# Altium PCB Secondary-PCB-v1.0.PcbDoc
Units mil, origin at the board's own origin, x right, y up, seen from the top; angles counter-clockwise.
Board outline 787.4 x 1661.72 mil, 2 copper layers (Top Layer, Bottom Layer), stack 57 mil thick; 32 components, 29 nets, 98 pads, 0 vias.
Unrouted connection lines stored in the file: 45.
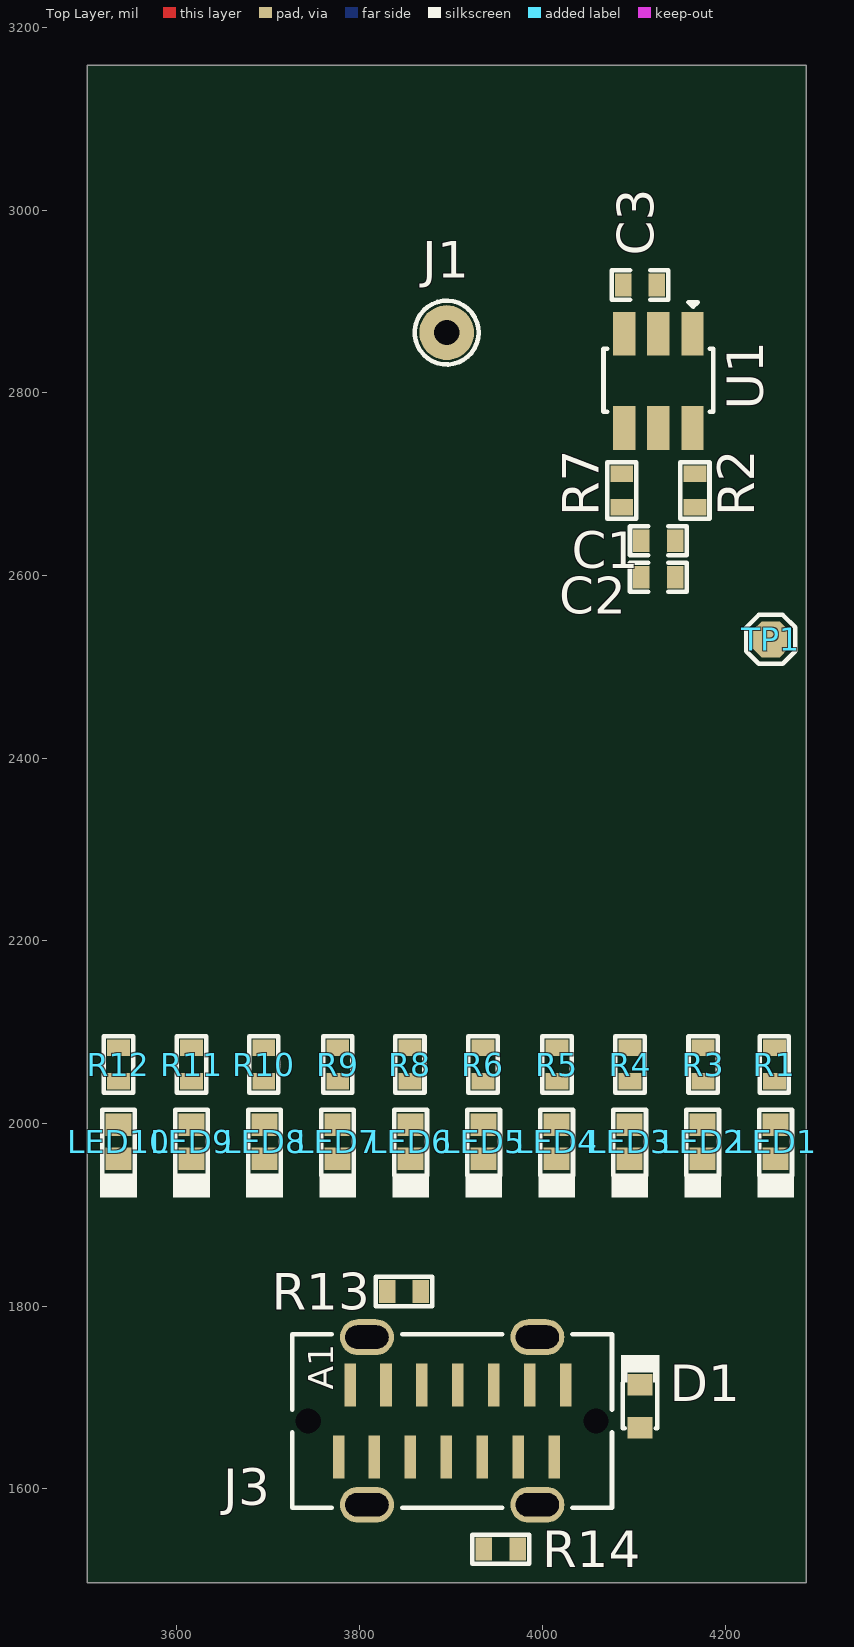
[diagram p0: Top Layer view]
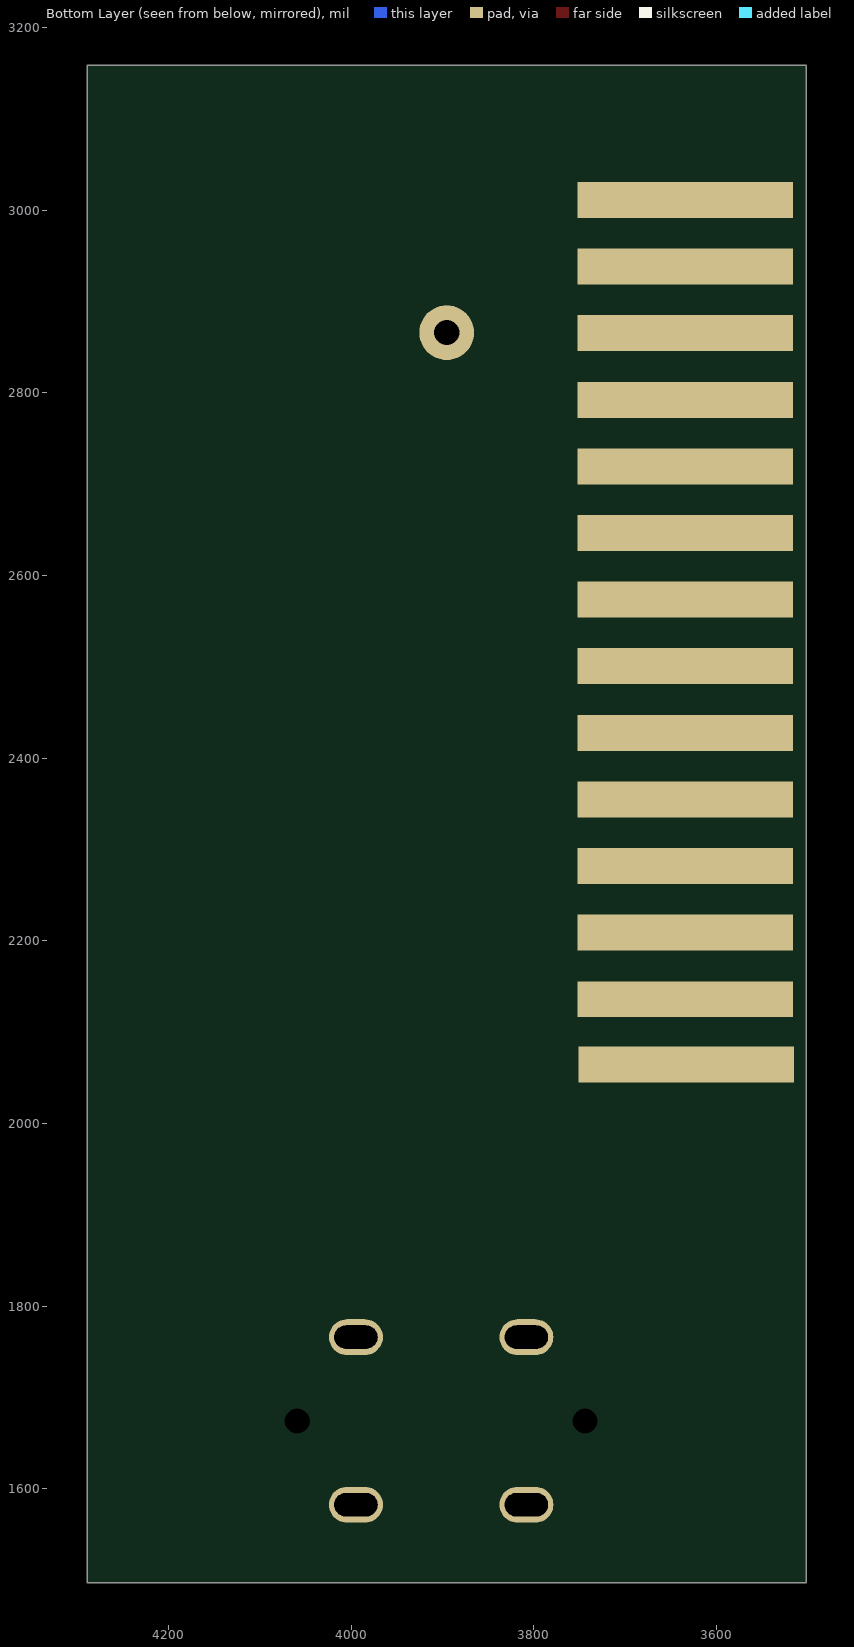
[diagram p1: Bottom Layer view, seen from below]

## Layer stack, top to bottom
Top Solder: solder mask 3, Solder Resist, Dk 3.5
Top Layer: signal copper 10
Dielectric 1: dielectric 37, FR-4, Dk 4.8
Bottom Layer: signal copper 10
Bottom Solder: solder mask 3, Solder Resist, Dk 3.5

## Board outline
3501.57,1497 3501.57,3158.72 4288.98,3158.72 4288.98,1497

## Design rules (kind name [scope] priority, off if disabled: settings)
Clearance [All] p1: gap=10 ignorepadtopadclearanceinfootprint=FALSE except(0: Arc-Hole Track-Hole SMDPad-Hole THPad-Hole Via-Hole Fill-Hole Poly-Hole Region-Hole Text-Hole)
PolygonConnect [All] p1: connectstyle=Relief reliefconductorwidth=10 reliefentries=4 polygonreliefangle="90 Angle" airgapwidth=10
RoutingVias [All] p1: holewidth=28 width=50 viastyle="Through Hole" minholewidth=28 minwidth=50 maxholewidth=28 maxwidth=50
SolderMaskExpansion [All] p1: expansion=4 istentingtop=FALSE
Width [All] p1: maxlimit=10 minlimit=10 preferedwidth=10
30 further rules are at their usual default settings.

## Components (designator, comment, footprint, x,y, rotation, side; value= is the part's Value field where it differs from the comment)
C1 "100nF" Cap-0402 4127,2638 r180 top
C2 "10uF" Cap-0402 4127,2598 r180 top
C3 "22PF" Cap-0402 4107,2918 r180 top value=22pF
D1 "LESD5D5.0CT1G" SOD-523 4107,1690.38 r90 top
J1 "F9-10-5.5Z" F9-10-5.5Z 3895.28,2865.83 r0 top
J3 "TYPE-C-31-D-07" TYPE-C-31-D-07 3901.3,1674.37 r90 top
LED1 "Blue" LED-0402 4255.31,1980 r270 top
LED2 "Blue" LED-0402 4175.39,1980 r270 top
LED3 "Blue" LED-0402 4095.47,1980 r270 top
LED4 "Blue" LED-0402 4015.55,1980 r270 top
LED5 "Blue" LED-0402 3935.63,1980 r270 top
LED6 "Blue" LED-0402 3855.71,1980 r270 top
LED7 "Blue" LED-0402 3775.79,1980 r270 top
LED8 "Blue" LED-0402 3695.87,1980 r270 top
LED9 "Blue" LED-0402 3615.94,1980 r270 top
LED10 "Blue" LED-0402 3536.02,1980 r270 top
R1 "10R" Res-0402 4254,2064.5 r90 top
R2 "0R" Res-0402 4167,2693 r270 top
R3 "10R" Res-0402 4176,2064.5 r90 top
R4 "10R" Res-0402 4096,2064.5 r90 top
R5 "10R" Res-0402 4016,2064.5 r90 top
R6 "10R" Res-0402 3935,2064.5 r90 top
R7 "0R" Res-0402 4087,2693 r270 top
R8 "10R" Res-0402 3855,2064.5 r90 top
R9 "10R" Res-0402 3776,2064.5 r90 top
R10 "10R" Res-0402 3695,2064.5 r90 top
R11 "10R" Res-0402 3616,2064.5 r90 top
R12 "10R" Res-0402 3536,2064.5 r90 top
R13 "5.1K" Res-0402 3848.5,1816 r180 top
R14 "5.1K" Res-0402 3954.5,1534 r0 top
TP1 "TEST POINT 0.5mm Dia" "Test-point - 0.5mm" 4250,2530 r180 top
U1 "TTP233H-BA6" SOT-23-6 4127,2813 r270 top

## Footprints (in the part's own frame and the unit in brackets; to place one, negate y for a bottom-side part, rotate by r counter-clockwise, add the part's x,y. Pads: shape width x height; smd on the part's side, far side on the other; paste and mask are expansions set on the pad)
Cap-0402 [mil]
  rect 18x25 smd mask+2.36: 1(-18.5,0) 2(18.5,0)
  silkscreen extent -31,-16 31,16, body extent -20,-10 20,10, height 19
F9-10-5.5Z [mil]
  round 60 hole 27.56: 1(0,0)
  silkscreen extent -35,-35 35,35
LED-0402 [mm]
  rect 0.62x0.72 smd: 1(-0.475,0) 2(0.475,0)
  silkscreen extent -0.89,-0.51 1.55,0.51, body extent -0.5,-0.25 0.51,0.25, height 0.45
Res-0402 [mil]
  rect 18x25 smd mask+2.17: 1(-18.5,0) 2(18.5,0)
  silkscreen extent -32,-17 32,16, body extent -23,-11 23,11, height 16
SOD-523 [mm] "SOD-523 Schottky Barrier Diodes (SBD) ROHS"
  rect 0.6x0.7 smd: 1(-0.6,0) 2(0.6,0)
  silkscreen extent -0.61,-0.53 1.42,0.53, body extent -0.8,-0.4 0.8,0.4, height 0.7
SOT-23-6 [mm]
  rect 1.22x0.62 smd: 1(-1.31,0.95) 2(-1.31,0) 3(-1.31,-0.95) 4(1.31,-0.95) 5(1.31,0) 6(1.31,0.95)
  silkscreen extent -2.18,-1.52 0.86,1.52, body extent -1.5,-1.5 1.5,1.5, height 1.47
"Test-point - 0.5mm" [mm]
  oct 1x1 smd: 1(0,0)
  silkscreen extent -0.68,-0.68 0.68,0.68
TYPE-C-31-D-07 [mm]
  rect 1.2x0.32 smd paste-100 mask+0.05: A1(1,2.84) A4(1,1.84) A5(1,0.84) A6(1,-0.16) A7(1,-1.16) A9(1,-2.16) A12(1,-3.16) B1(-1,-2.84) B4(-1,-1.84) B5(-1,-0.84) B6(-1,0.16) B7(-1,1.16) B9(-1,2.16) B12(-1,3.16)
  oval 1x1.5 hole 0.65 slot 1.2 at 90 deg paste-2539.97 mask+0.05: S1(2.33,2.37) S2(2.33,-2.37) S3(-2.33,-2.37) S4(-2.33,2.37)
  round 0 hole 0.7 unplated paste-2539.97: ""(0,4) ""(0,-4)
  silkscreen extent -2.41,-4.45 2.41,4.44, body extent -2.48,-4.47 2.48,4.47, height 10

## Part data
C1: library part CC0402KRX5R7BB104, "CAP CER 0.1UF 16V X5R 0402", Case Code (Imperial)=0402, Case Code (Metric)=1005, Dielectric=X5R, LCSC Part Number=C106204, Manufacturer=Yageo, Max Operating Temperature=85°C, Min Operating Temperature=-55°C, Package Quantity=1, Resistor Type=Ceramic, Supplier Part Number 1=603-CC402KRX5R7BB104, Tolerance=10%, Voltage Rating=16V, Capacitance=100nF, Case/Package=0402, Category="Ceramic Capacitors", ComponentLink1Description=https://datasheet.ciiva.com/155/mlccorderingcode-155879.pdf?src-supplier=Digi-Key, ComponentLink1URL=https://datasheet.ciiva.com/155/mlccorderingcode-155879.pdf?src-supplier=Digi-Key, ComponentLink2Description=https://datasheet.ciiva.com/155/mlccorderingcode-155878.pdf?src-supplier=Digi-Key, ComponentLink2URL=https://datasheet.ciiva.com/155/mlccorderingcode-155878.pdf?src-supplier=Digi-Key, ComponentLink3Description=https://datasheet.ciiva.com/155/mlccorderingcode-155880.pdf?src-supplier=Digi-Key, ComponentLink3URL=https://datasheet.ciiva.com/155/mlccorderingcode-155880.pdf?src-supplier=Digi-Key, ComponentLink4Description=https://datasheet.ciiva.com/11464/upy-gphc-x5r-4v-to-50v-12-11464869.pdf?src-supplier=Avnet, ComponentLink4URL=https://datasheet.ciiva.com/11464/upy-gphc-x5r-4v-to-50v-12-11464869.pdf?src-supplier=Avnet, Construction=Flat, Depth=0.5mm, Halogen Free="Halogen Free", Height=0.5mm, Lead Free="Lead Free", Length=1mm, Manufacturer Part Number=CC0402KRX5R7BB104, Mount="Surface Mount", Number of Pins=2, Packaging="Tape and Reel", Pricing 1="1=0.10000, 10=0.02300, 50=0.02300, 100=0.01100, 1000=0.00600, 10000=0.00400 (USD)", Radiation Hardening=No, REACH SVHC=Unknown, RoHS=Yes, RoHS Compliant=Yes, Series=CC, Stock 1=936792, Supplier 1=Mouser, Termination=SMD/SMT, Thickness=0.022inch, Voltage Rating (DC)=16V, Width=0.02inch
C2: library part CC0402MRX5R6BB106, "CAP CER 10UF 10V X5R 0402", Case Code (Imperial)=0402, Case Code (Metric)=1005, LCSC Part Number=C962143, Manufacturer=Yageo, Max Operating Temperature=85°C, Min Operating Temperature=-55°C, Supplier Part Number 1=6097631, Tolerance=20%, Voltage Rating=10V, Capacitance=10uF, Case/Package=0402, Category="Ceramic Capacitors", ComponentLink1Description=http://www.yageo.com/documents/recent/UPY-GPHC_X5R_4V-to-50V_25.pdf?src-supplier=Digi-Key, ComponentLink1URL=http://www.yageo.com/documents/recent/UPY-GPHC_X5R_4V-to-50V_25.pdf?src-supplier=Digi-Key, Item Type=Capacitor, Manufacturer Part Number=CC0402MRX5R6BB106, Mount="Surface Mount", Packaging="Tape and Reel", Pricing 1="10000=0.02650, 20000=0.02590, 30000=0.02550, 40000=0.02530, 50000=0.02450 (USD)", RoHS=Yes, RoHS Compliant=Yes, Stock 1=80000, Supplier 1="Future Electronics"
C3: library part CC0402JRNPO9BN220, "CAP CER 22PF 50V C0G/NPO 0402", Case Code (Imperial)=0402, Case Code (Metric)=1005, Dielectric=C0G, Dielectric Material=Ceramic, Insulation Resistance=100GR, LCSC Part Number=C106203, Manufacturer=Yageo, Max Operating Temperature=125°C, Min Operating Temperature=-55°C, Package Quantity=1, Supplier Part Number 1=9105957, Temperature Coefficient=30ppm/°C, Tolerance=5%, Voltage=50V, Case/Package=0402, Category="Ceramic Capacitors", ComponentLink1Description=https://datasheet.ciiva.com/5789/1443161-5789509.pdf?src-supplier=Farnell, ComponentLink1URL=https://datasheet.ciiva.com/5789/1443161-5789509.pdf?src-supplier=Farnell, ComponentLink2Description=https://datasheet.ciiva.com/8033/1443161-8033606.pdf?src-supplier=Element14, ComponentLink2URL=https://datasheet.ciiva.com/8033/1443161-8033606.pdf?src-supplier=Element14, ComponentLink3Description=https://datasheet.ciiva.com/7656/1132289-7656615.pdf?src-supplier=Element14, ComponentLink3URL=https://datasheet.ciiva.com/7656/1132289-7656615.pdf?src-supplier=Element14, ComponentLink4Description=https://datasheet.ciiva.com/8033/1443161-8033607.pdf?src-supplier=Element14, ComponentLink4URL=https://datasheet.ciiva.com/8033/1443161-8033607.pdf?src-supplier=Element14, ComponentLink5Description=https://datasheet.ciiva.com/8033/1443161-8033605.pdf?src-supplier=Element14, ComponentLink5URL=https://datasheet.ciiva.com/8033/1443161-8033605.pdf?src-supplier=Element14, ComponentLink6Description=https://datasheet.ciiva.com/143/mlccorderingcode-143987.pdf?src-supplier=Digi-Key, ComponentLink6URL=https://datasheet.ciiva.com/143/mlccorderingcode-143987.pdf?src-supplier=Digi-Key, ComponentLink7Description=https://datasheet.ciiva.com/143/mlccorderingcode-143986.pdf?src-supplier=Digi-Key, ComponentLink7URL=https://datasheet.ciiva.com/143/mlccorderingcode-143986.pdf?src-supplier=Digi-Key, ComponentLink8Description=https://datasheet.ciiva.com/143/mlccorderingcode-143988.pdf?src-supplier=Digi-Key, ComponentLink8URL=https://datasheet.ciiva.com/143/mlccorderingcode-143988.pdf?src-supplier=Digi-Key, ComponentLink9Description=https://datasheet.ciiva.com/5425/upy-gp-np0-16v-to-50v-8-5425483.pdf?src-supplier=Mouser, ComponentLink9URL=https://datasheet.ciiva.com/5425/upy-gp-np0-16v-to-50v-8-5425483.pdf?src-supplier=Mouser, ComponentLink10Description=https://datasheet.ciiva.com/15189/getdatasheetpartid-370074-15189117.pdf?src-supplier=Verical, ComponentLink10URL=https://datasheet.ciiva.com/15189/getdatasheetpartid-370074-15189117.pdf?src-supplier=Verical, Depth=0.5mm, Height=0.5mm, Item Type=Capacitor, Lead Free="Lead Free", Length=1mm, Manufacturer Part Number=CC0402JRNPO9BN220, Mounting Technology="Surface Mount", Packaging="Tape and Reel", Pins=2, Pricing 1="10000=0.00220, 40000=0.00210, 150000=0.00200, 400000=0.00190, 1000000=0.00180 (USD)", Radiation Hardening=No, Reach SVHC Compliant=Yes, Resistor Type=Ceramic, RoHS=Yes, RoHS Compliant=Yes, Series=CC, Stock 1=200000, Supplier 1="Future Electronics", Termination=SMD/SMT, Thickness=0.022inch, Voltage Rating=50V, Voltage Rating (DC)=50V, Width=0.02inch
D1: "SOD-523 ESD Protection Devices ROHS", LCSC Part Number=C5199850, Manufacturer=UMW, Package=SOD-523, ComponentLink1Description=LCSC, ComponentLink1URL=https://www.lcsc.com/product-detail/span-style-background-color-ff0-ESD-span-Protection-Devices_UMW-Youtai-Semiconductor-Co-Ltd-LESD5D5-0CT1G_C5199850.html, Item Type="Protection Device", Manufacturer Part Number=LESD5D5.0CT1G
J1: "Press spring", LCSC Part Number=C5143797, Manufacturer=Sam&wing, Package=Custom, ComponentLink1Description=LCSC, ComponentLink1URL=https://www.lcsc.com/product-detail/Press-spring_Sam-wing-F9-10-5-5Z_C5143797.html, Item Type="Press spring", Manufacturer Part Number=F9-10-5.5Z
J3: "1 Brick nogging 14P Female Type-C SMD USB Connectors ROHS", LCSC Part Number=C2689965, Manufacturer="Korean Hroparts Elec", Package=SMD, ComponentLink1Description=LCSC, ComponentLink1URL=https://www.lcsc.com/product-detail/USB-Connectors_Korean-Hroparts-Elec-TYPE-C-31-D-07_C2689965.html, Item Type="USB Connector", Manufacturer Part Number=TYPE-C-31-D-07
LED1 LED2 LED3 LED4 LED5 LED6 LED7 LED8 LED9 LED10: library part NCD0402B1, "blue 0402 Light Emitting Diodes (LED) ROHS", LCSC Part Number=C130724, Manufacturer="Foshan NationStar Optoelectronics", Package=0402, ComponentLink1Description=LCSC, ComponentLink1URL=https://www.lcsc.com/product-detail/LED-Indication-Discrete_Foshan-NationStar-Optoelectronics-NCD0402B1_C130724.html, Item Type=LED, Manufacturer Part Number=NCD0402B1
R1 R3 R4 R5 R6 R8 R9 R10 R11 R12: library part CRCW040210R0FKEDHP, "RES SMD 10 OHM 1% 1/5W 0402", Case Code (Imperial)=0402, Case Code (Metric)=1005, LCSC Part Number=C4013850, Manufacturer="Vishay Dale", Max Operating Temperature=155°C, Max Power Dissipation=200mW, Min Operating Temperature=-55°C, Package Quantity=10000, Power Rating=125mW, Resistance Tolerance=1%, Resistor Type="Thick Film", Supplier Part Number 1=541-10.0YCT-ND, Temperature Coefficient=100ppm/°C, Voltage Rating=50V, Case/Package=0402, ComponentLink1Description=http://www.mouser.com/ds/2/427/crcwhpe3-46056.pdf?src-supplier=Mouser, ComponentLink1URL=http://www.mouser.com/ds/2/427/crcwhpe3-46056.pdf?src-supplier=Mouser, Construction=Rectangular, Contact Plating=Tin, Depth=0.5mm, Features="Automotive AEC-Q200", Height=0.3mm, Lead Free="Lead Free", Length=1mm, Manufacturer Part Number=CRCW040210R0FKEDHP, Military Standard=Not, Mount="Surface Mount", Number of Terminations=2, Packaging="Tape and Reel", Pricing 1="1=0.15, 10=0.132, 100=0.0506, 1000=0.02226, 2500=0.01923, 5000=0.0172 (USD)", Radiation Hardening=No, REACH SVHC=Unknown, Resistance=10R, RoHS Compliant=Yes, Series=CRCW-HP, Stock 1=28500, Supplier 1=Digi-Key, Technology="THICK FILM", Termination=SMD/SMT, Tolerance=1%, Voltage Rating (DC)=50V, Weight=2.3E-05oz, Width=0.5mm
R2 R7: library part RC0402FR-070RL, "RES 0 OHM JUMPER 1/16W 0402", Case Code (Imperial)=0402, Case Code (Metric)=1005, LCSC Part Number=C106231, Manufacturer=Yageo, Max Operating Temperature=155°C, Max Power Dissipation=63mW, Min Operating Temperature=-55°C, Power Rating=62.5mW, Resistor Type="Thick Film", Supplier Part Number 1=603-RC0402FR-070RL, Temperature Coefficient=200ppm/°C, Tolerance=1%, Voltage Rating=50V, Case/Package=0402, ComponentLink1Description=https://datasheet.ciiva.com/8896/pyu-rc0402-51-rohs-l-6-8896149.pdf?src-supplier=Avnet, ComponentLink1URL=https://datasheet.ciiva.com/8896/pyu-rc0402-51-rohs-l-6-8896149.pdf?src-supplier=Avnet, ComponentLink2Description=https://datasheet.ciiva.com/16790/pyu-rc0402-51-rohs-l-6-r-16790444.pdf?src-supplier=Future+Electronics, ComponentLink2URL=https://datasheet.ciiva.com/16790/pyu-rc0402-51-rohs-l-6-r-16790444.pdf?src-supplier=Future+Electronics, Contact Plating=Tin,Matte, Features="Moisture Resistant", Height=0.35mm, Item Type=Resistors, Lead Free="Lead Free", Length=1mm, Manufacturer Part Number=RC0402FR-070RL, Mount="Surface Mount", Number of Terminations=2, Packaging="Tape and Reel", Pricing 1="1=0.10000, 10=0.01400, 50=0.01400, 100=0.00600, 1000=0.00300, 5000=0.00200, 10000=0.00100 (USD)", Radiation Hardening=No, Resistance=0R, RoHS=Yes, RoHS Compliant=Yes, Series=RC, Size Code=0402, Stock 1=8556842, Supplier 1=Mouser, Termination=SMD/SMT, Width=0.5mm
R13 R14: library part RC0402FR-075K1L, "RES 5.1K OHM 1% 1/16W 0402", Case Code (Imperial)=0402, Case Code (Metric)=1005, LCSC Part Number=C105872, Manufacturer=Yageo, Max Operating Temperature=155°C, Max Power Dissipation=63mW, Min Operating Temperature=-55°C, Package Quantity=1, Resistance=5.1kR, Resistance Tolerance=1%, Resistor Type="Thick Film", Temperature Coefficient=100ppm/°C, Voltage Rating=50V, Case/Package=0402, Category="Chip SMD Resistors", ComponentLink1Description=https://datasheet.ciiva.com/7983/1018594-7983519.pdf?src-supplier=Element14, ComponentLink1URL=https://datasheet.ciiva.com/7983/1018594-7983519.pdf?src-supplier=Element14, ComponentLink2Description=https://datasheet.ciiva.com/46394/1018594-46394936.pdf?src-supplier=Element14, ComponentLink2URL=https://datasheet.ciiva.com/46394/1018594-46394936.pdf?src-supplier=Element14, ComponentLink3Description=https://datasheet.ciiva.com/2453/pyu-r-int-thick-7-2453401.pdf?src-supplier=Digi-Key, ComponentLink3URL=https://datasheet.ciiva.com/2453/pyu-r-int-thick-7-2453401.pdf?src-supplier=Digi-Key, ComponentLink4Description=https://datasheet.ciiva.com/2453/pyu-r-int-thick-7-2453402.pdf?src-supplier=Digi-Key, ComponentLink4URL=https://datasheet.ciiva.com/2453/pyu-r-int-thick-7-2453402.pdf?src-supplier=Digi-Key, ComponentLink5Description=https://datasheet.ciiva.com/2453/pyu-r-int-thick-7-2453400.pdf?src-supplier=Digi-Key, ComponentLink5URL=https://datasheet.ciiva.com/2453/pyu-r-int-thick-7-2453400.pdf?src-supplier=Digi-Key, ComponentLink6Description=https://datasheet.ciiva.com/12558/pyu-rc0402-51-rohs-l-6-r-8721-12558460.pdf?src-supplier=Mouser, ComponentLink6URL=https://datasheet.ciiva.com/12558/pyu-rc0402-51-rohs-l-6-r-8721-12558460.pdf?src-supplier=Mouser, ComponentLink7Description=https://datasheet.ciiva.com/16744/pyu-rc0402-51-rohs-l-6-r-16744283.pdf?src-supplier=Future+Electronics, ComponentLink7URL=https://datasheet.ciiva.com/16744/pyu-rc0402-51-rohs-l-6-r-16744283.pdf?src-supplier=Future+Electronics, ComponentLink8Description=https://datasheet.ciiva.com/15189/getdatasheetpartid-323636-15189493.pdf?src-supplier=Verical, ComponentLink8URL=https://datasheet.ciiva.com/15189/getdatasheetpartid-323636-15189493.pdf?src-supplier=Verical, Construction=Rectangular, Depth=0.5mm, Features="Moisture Resistant", Height=0.016inch, Item Type=Resistor, Lead Free="Lead Free", Length=1mm, Manufacturer Part Number=RC0402FR-075K1L, Military Standard=Not, Number of Terminations=2, Packaging="Tape and Reel", Power Rating=63mW, Pricing 1="10000=0.00085 (USD)", RoHS=Yes, RoHS Compliant=Yes, Series=RC, Stock 1=65000, Supplier 1=Avnet, Supplier Part Number 1=RC0402FR-075K1L, Technology="THICK FILM", Termination=SMD/SMT, Tolerance=1%, Voltage Rating (DC)=50V, Width=0.02inch, Working Voltage=50V
TP1: "Test Point ON", Item Type="Test Point", Manufacturer Part Number="TEST POINT 0.5mm Dia"
U1: "SOT-23-6L Touch Sensors ROHS", LCSC Part Number=C2890349, Manufacturer="Tontek Design Tech", Package=SOT-23-6L, ComponentLink1Description=LCSC, ComponentLink1URL=https://www.lcsc.com/product-detail/Touch-Sensors_Tontek-Design-Tech-TTP233H-BA6_C2890349.html, Item Type=IC, Manufacturer Part Number=TTP233H-BA6

## Free pads (board coordinates)
  rect 236.22x39.37 smd far side: 1(3634,3011) 2(3634,2938.08) 3(3634,2865.17) 4(3634,2792.25) 5(3634,2719.33) 6(3634,2646.42) 7(3634,2573.5) 8(3634,2500.58) 9(3634,2427.67) 10(3634,2354.75) 11(3634,2281.83) 12(3634,2208.92) 13(3634,2136) 14(3633,2064.5)

## Nets (pads, with @x,y where several pads share a name; then routed paths per layer and width w, separated by ;. In a path a pad name is that pad's centre, name@x,y a point inside that pad or via, vN(x,y) a via of type N, cw(c..) or ccw(c..) an arc to the next point about the centre after c; other vN are vias at no path point)
3V3: C1.2 C2.2 R1.2 R3.2 R4.2 R5.2 R6.2 R8.2 R9.2 R10.2 R11.2 R12.2 TP1.1 U1.5
GND: C1.1 C2.1 C3.1 D1.1 J3.A1 J3.A12 J3.B1 J3.B12 R2.2 R7.2 R13.2 R14.2 U1.2
LED1: LED1.2
LED2: LED2.2
LED3: LED3.2
LED4: LED4.2
LED5: LED5.2
LED6: LED6.2
LED7: LED7.2
LED8: LED8.2
LED9: LED9.2
LED10: LED10.2
NetC3_2: C3.2 J1.1 U1.3
NetJ3_A5: J3.A5 R13.1
NetJ3_B5: J3.B5 R14.1
NetLED1_1: LED1.1 R1.1
NetLED2_1: LED2.1 R3.1
NetLED3_1: LED3.1 R4.1
NetLED4_1: LED4.1 R5.1
NetLED5_1: LED5.1 R6.1
NetLED6_1: LED6.1 R8.1
NetLED7_1: LED7.1 R9.1
NetLED8_1: LED8.1 R10.1
NetLED9_1: LED9.1 R11.1
NetLED10_1: LED10.1 R12.1
NetR2_1: R2.1 U1.6
NetR7_1: R7.1 U1.4
TOUCH_SIG: U1.1
VBUS: D1.2 J3.A4 J3.A9 J3.B4 J3.B9
pads on no net: J3. J3.A6 J3.A7 J3.B6 J3.B7 J3.S1 J3.S2 J3.S3 J3.S4

## Silkscreen, mask and mechanical layers (free items; w line width, h text height)
Mechanical 1:
  circle w0.5: c3895.28,2865.83 r157.48
  circle w0.5: c3536.02,1980 r24.61
  circle w0.5: c3615.94,1980 r24.61
  circle w0.5: c3695.87,1980 r24.61
  circle w0.5: c3775.79,1980 r24.61
  circle w0.5: c3855.71,1980 r24.61
  circle w0.5: c3935.63,1980 r24.61
  circle w0.5: c4015.55,1980 r24.61
  circle w0.5: c4095.47,1980 r24.61
  circle w0.5: c4175.39,1980 r24.61
  circle w0.5: c4255.31,1980 r24.61
  circle w0.25: c3895.28,1980 r0.12
  circle w0.25: c3895.28,1980 r0.12
  region: 4145.28,4207.72 3895.28,4247.72 4145.28,4287.72
  region: 4145.28,459.69 3895.28,499.69 4145.28,539.69
  lines w0.5: 3422.83,2373.7 4367.72,2373.7 ; 3511.42,1980 4279.13,1980 ; 3560.63,1899.7 3560.63,1980 ; 3591.34,1899.7 3591.34,1980 ; 3895.28,437.19 3895.28,937.44 ; 3895.28,499.69 4395.28,499.69 ; 3895.28,3810.22 3895.28,4310.22 ; 3895.28,4247.72 4395.28,4247.72 ; 3422.83,831.31 ccw(c3448.67,836.53) 3452.36,810.43 ; 3422.83,831.31 3422.83,1201.95 ; 3422.83,831.31 3422.83,828.43 ccw(c3452.36,828.43) 3452.36,798.9 ; 3422.83,1201.95 ccw(c3448.67,1207.17) 3452.36,1181.07 ; 3422.83,1201.95 3422.83,1208.91 ; 3422.83,1208.91 3422.83,3909.13 ; 3422.83,1208.91 3452.36,1208.91 ; 3422.83,3909.13 3422.83,3918.98 cw(c3452.36,3918.98) 3452.36,3948.5 ; 3422.83,3909.13 3452.36,3909.13 ; 3452.36,798.9 3452.36,810.43 ; 3452.36,798.9 3895.28,798.9 ; 3452.36,810.43 3895.28,810.43 ; 3452.36,810.43 3452.36,1181.07 ; 3452.36,1181.07 3895.28,1181.07 ; 3452.36,1181.07 3452.36,1208.91 ; 3452.36,1208.91 3895.28,1208.91 ; 3452.36,1208.91 3452.36,3909.13 ; 3452.36,3909.13 3452.36,3948.5 ; 3452.36,3909.13 3895.28,3909.13 ; 3452.36,3948.5 3895.28,3948.5 ; 3511.42,1842.2 4279.13,1842.2 ; 3511.42,1842.2 3511.42,2117.8 ; 3511.42,1842.2 4279.13,2117.8 ; 3511.42,2117.8 4279.13,2117.8 ; 3511.42,2117.8 4279.13,1842.2 ; 3895.28,798.9 4338.19,798.9 ; 3895.28,798.9 3895.28,810.43 ; 3895.28,810.43 4338.19,810.43 ; 3895.28,810.43 3895.28,1181.07 ; 3895.28,1181.07 4338.19,1181.07 ; 3895.28,1181.07 3895.28,1208.91 ; 3895.28,1208.91 4338.19,1208.91 ; 3895.28,1208.91 3895.28,3909.13 ; 3895.28,3909.13 3895.28,3948.5 ; 3895.28,3909.13 4338.19,3909.13 ; 3895.28,3948.5 4338.19,3948.5 ; 4279.13,1842.2 4279.13,2117.8 ; 4338.19,798.9 ccw(c4338.19,828.43) 4367.72,828.43 4367.72,831.31 ; 4338.19,798.9 4338.19,810.43 ; 4338.19,810.43 ccw(c4341.88,836.53) 4367.72,831.31 ; 4338.19,810.43 4338.19,1181.07 ; 4338.19,1181.07 ccw(c4341.88,1207.17) 4367.72,1201.95 ; 4338.19,1181.07 4338.19,1208.91 ; 4338.19,1208.91 4338.19,3909.13 ; 4338.19,1208.91 4367.72,1208.91 ; 4338.19,3909.13 4338.19,3948.5 ; 4338.19,3909.13 4367.72,3909.13 ; 4338.19,3948.5 cw(c4338.19,3918.98) 4367.72,3918.98 4367.72,3909.13 ; 4367.72,831.31 4367.72,1201.95 ; 4367.72,1201.95 4367.72,1208.91 ; 4367.72,1208.91 4367.72,3909.13
  text "A" at 4259.38,4466.58 h137.8
  text "A" at 4259.38,426.8 h137.8
Dimension:
  the board outline again, w10

## Text inside footprints (layer, text, board x,y; h text height)
J3: Top Overlay "A1" at 3771.3,1708.37 h27.56 r90